# Altium PCB PS3604LF.PcbDoc (part 2 of 2)
Units mm, origin at the board's own origin, x right, y up, seen from the top; angles counter-clockwise.
Board outline 115 x 36 mm, 2 copper layers (Top Layer, Bottom Layer), stack 1.571 mm thick; 93 components, 88 nets, 378 pads, 83 vias.
Unrouted connection lines stored in the file: 6.
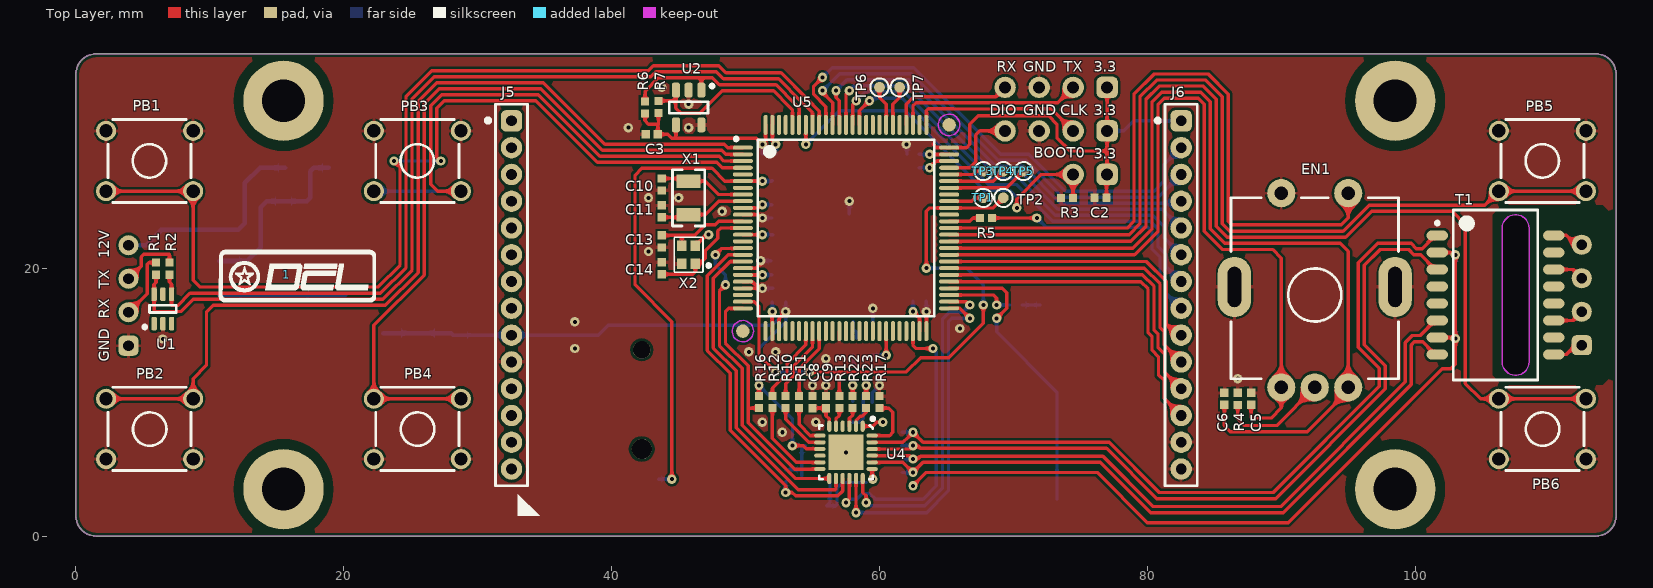
[diagram p0: Top Layer view]

## Via types
v1: diameter 0.7, hole 0.3, Top Layer to Bottom Layer, tented both sides, 83 vias

## Nets (pads, with @x,y where several pads share a name; then routed paths per layer and width w, separated by ;. In a path a pad name is that pad's centre, name@x,y a point inside that pad or via, vN(x,y) a via of type N, cw(c..) or ccw(c..) an arc to the next point about the centre after c; other vN are vias at no path point) (continued)
NetEN1_C: (continued)
  Top Layer w0.25: R4.2 86.75,8.75 87.25,8.25 89.65,8.25 EN1.C
NetLD1_1: LD1.1 R9.1 | length 1.4
  Bottom Layer w0.25: LD1.1 58.05,15.45 58.3,15.2 R9.1
NetLD2_1: LD2.1 R14.1 | length 1.4
  Bottom Layer w0.25: LD2.1 58.05,12.95 58.3,12.7 R14.1
NetLD3_1: LD3.1 R23.2 | length 4.3
  Top Layer w0.25: R23.2 v1(59,11.25)
  Bottom Layer w0.25: LD3.1@57.95,8.5 LD3.1 58.5,8.5 58.775,8.775 58.775,10.61 59,10.835 v1(59,11.25)
NetLD4_2: LD4.2 R22.2 | length 2
  Top Layer w0.25: R22.2 v1(58,11.25)
  Bottom Layer w0.25: LD4.2@58,10.05 v1(58,11.25)
NetLS1_2: LS1.2 R8.1 | length 1.4
  Bottom Layer w0.25: R8.1 LS1.2@72,17.25
NetR10_2: R10.2 U4.8 | length 4.1
  Top Layer w0.25: R10.2 53,8.705 54.705,7 U4.8
NetR11_2: R11.2 U4.7 | length 3.1
  Top Layer w0.25: R11.2 54,8.341 54.841,7.5 U4.7
NetR12_2: R12.2 U4.11 | length 6.5
  Top Layer w0.25: R12.2 52,7.295 53.795,5.5 U4.11
NetR13_2: R13.2 U4.5 | length 1.5
  Top Layer w0.25: U4.5@56.775,8.225 U4.5 56.75,8.75 57,9 R13.2
NetR17_1: R17.1 U4.24 | length 4.3
  Top Layer w0.25: U4.24 60.75,7.5 61,7.75 61,9.25 60.7,9.55 R17.1
NRST: C31.2 U5.14 | length 2.3
  Top Layer w0.25: U5.14 v1(51.25,22.5)
  Bottom Layer w0.25: v1(51.25,22.5) C31.2@52.05,22.5
OSC32_IN: C10.2 U5.8 X1.2 | length 6.3
  Top Layer w0.25: C10.2 X1.2@45.55,26.7 ; X1.2 47,26.5 48,25.5 U5.8
OSC32_OUT: C11.2 U5.9 X1.1 | length 6.3
  Top Layer w0.25: C11.2 X1.1@45.55,23.8 ; X1.1 47,24 48,25 U5.9
OSC_IN: C13.2 U5.12 X2.3 | length 7.3
  Top Layer w0.25: C13.2 45.25,22.45 ; X2.3 45.25,22.45 ; U5.12 48,23.5 47.75,23.25 47,23.25 46.2,22.45 45.25,22.45
OSC_OUT: C14.2 U5.13 X2.1 | length 8.5
  Top Layer w0.25: C14.2 46.05,19.55 46.25,19.75 X2.1 46.575,20.325 47,20.75 47,21.295 47.925,22.22 47.925,22.78 48.145,23 U5.13
RCC_MCO1: TP1.1 U5.67 | length 2.7
  Top Layer w0.25: U5.67 66.895,25 67.145,25.25 TP1.1
RD_N: R18.1 T1.3 U4.22 | length 60.9
  Top Layer w0.25: U4.22 62.25,6.5 v1(62.5,6.75)
  Top Layer w0.254: v1(62.5,6.75) 62.679,6.929 63.062,6.546 76.954,6.546 80.704,2.796 89.583,2.796 97.774,10.988 97.774,12.702 96.2,14.276 96.2,20.218 97.378,21.396 99.508,21.396 99.904,21 100.407,21 101.502,19.905 T1.3
  Bottom Layer w0.25: R18.1 v1(62.5,6.75)
RD_P: R19.1 T1.1 U4.23 | length 61.1
  Top Layer w0.25: U4.23 61.75,7 62.133,7.383
  Top Layer w0.254: 62.133,7.383 v1(62.5,7.75) 62.679,7.571 63.25,7 77.142,7 80.892,3.25 89.395,3.25 97.32,11.176 97.32,12.514 95.746,14.088 95.746,20.406 97.19,21.85 99.696,21.85 100.08,21.466 100.523,21.466 101.502,22.445 T1.1
  Bottom Layer w0.25: R19.1 v1(62.5,7.75)
RX_N: J7.3 T1.14 | length 2.4
  Top Layer w0.254: T1.14 111.78,19.905 J7.3
RX_P: J7.4 T1.16 | length 2.4
  Top Layer w0.254: T1.16 111.277,22.445 111.972,21.75 J7.4
SPI3_CLK: J6.4 U5.89 | length 32.2
  Top Layer w0.25: v1(56.75,33.25) 56.75,32.75 57,32.5 U5.89
  Bottom Layer w0.25: v1(56.75,33.25) 57.575,34.075 62.198,34.075 68.673,27.6 70.764,27.6 73.514,24.85 82,24.85 J6.4@82,25
SPI3_MISO: J6.3 U5.90 | length 35.9
  Top Layer w0.25: v1(55.75,33.25) 55.75,33.114 56.5,32.364 U5.90
  Bottom Layer w0.25: v1(55.75,33.25) 57.025,34.525 62.384,34.525 68.859,28.05 70.95,28.05 73.7,25.3 80.8,25.3 82.5,27 82,27.5 J6.3@82,27
SPI3_MOSI: J6.2 U5.91 | length 37.2
  Top Layer w0.25: v1(55.75,34.25) 55.075,33.575 55.075,32.97 56,32.045 U5.91
  Bottom Layer w0.25: v1(55.75,34.25) 56.475,34.975 62.571,34.975 69.046,28.5 71.137,28.5 73.887,25.75 80.5,25.75 81.203,26.453 81.203,27.678 J6.2
SWCLK: J3.2 U5.76 | length 12.8
  Top Layer w0.25: U5.76 63.5,31.75 63.648,31.898 65.567,31.898 65.578,31.887 69.04,31.887 69.051,31.898 72.812,31.898 J3.2
SWDIO: J3.4 U5.72 | length 6.5
  Top Layer w0.25: U5.72 66.75,27.5 67.2,27.95 67.2,29.95 67.5,30.25 J3.4
TD_N: R20.1 T1.8 U4.20 | length 52.6
  Top Layer w0.25: U4.20 61.75,5.5 v1(62.5,4.75)
  Top Layer w0.254: v1(62.5,4.75) 63.25,5.5 76.5,5.5 80.25,1.75 90.137,1.75 99.704,11.317 99.704,14.264 99.938,14.498 100.559,14.498 101.502,13.555 T1.8
  Bottom Layer w0.25: R20.1 v1(62.5,4.75)
TD_P: R21.1 T1.6 U4.21 | length 52.4
  Top Layer w0.25: U4.21 62.25,6 v1(62.5,5.75)
  Top Layer w0.254: v1(62.5,5.75) 62.679,5.571 63.062,5.954 76.688,5.954 80.438,2.204 89.949,2.204 99.25,11.505 99.25,14.452 99.773,14.975 100.382,14.975 101.502,16.095 T1.6
  Bottom Layer w0.25: R21.1 v1(62.5,5.75)
TIM4_CH1: C5.2 EN1.A U5.59 | length 60.5
  Top Layer w0.25: U5.59 79.046,21 80.8,22.754 80.8,32.254 81.246,32.7 83.8,32.7 84.25,32.25 84.25,22.75 85.6,21.4 89.35,21.4 90,20.75 EN1.A 90,9.564 89.25,8.814 87.75,8.814 C5.2
TIM4_CH2: C6.2 EN1.B U5.60 | length 73.3
  Top Layer w0.25: U5.60 78.909,21.5 80.35,22.941 80.35,32.441 81.059,33.15 83.986,33.15 84.7,32.436 84.7,22.936 85.786,21.85 94.4,21.85 95,21.25 95,10.864 91.936,7.8 86.2,7.8 85.75,8.25 C6.2
TIM8_CH2: R5.2 U5.64 | length 2.4
  Top Layer w0.25: U5.64 66.75,23.5 67,23.75 R5.2
TIM12_CH1: R8.2 U5.53 | length 5.1
  Top Layer w0.25: U5.53 68.5,18 68.75,17.75 v1(68.75,17.25)
  Bottom Layer w0.25: v1(68.75,17.25) R8.2
TIM12_CH2: LS1.1 U5.54 | length 22
  Top Layer w0.25: U5.54 69.173,18.5 69.5,18.173 69.5,17 v1(68.75,16.25)
  Bottom Layer w0.25: v1(68.75,16.25) 68.75,15.25 73.25,10.75 LS1.1
TX_N: J7.1 T1.9 | length 2.4
  Top Layer w0.254: T1.9 111.277,13.555 111.972,14.25 J7.1
TX_P: J7.2 T1.11 | length 2.4
  Top Layer w0.254: T1.11 111.78,16.095 J7.2
UART1_RX: R1.2 U1.6 U5.93 | length 69
  Top Layer w0.25: R1.2 5.991,18.961 5.841,18.811 U1.6 5.841,16.861 5.941,16.761 7.84,16.761 8.752,17.673 22.91,17.673 25.1,19.864 25.1,32.646 26.754,34.3 42.937,34.3 43.312,34.675 47.825,34.675 48.35,34.15 52.464,34.15 54.175,32.439 54.175,32.416 55,31.591 U5.93
UART1_TX: R2.2 U1.4 U5.92 | length 67.8
  Top Layer w0.25: R2.2 6.991,18.961 7.141,18.811 U1.4 ; U1.4@7.141,17.811 7.141,17.211 7.605,17.211 8.517,18.123 22.723,18.123 24.65,20.05 24.65,32.832 26.568,34.75 42.75,34.75 43.125,35.125 48.011,35.125 48.536,34.6 52.65,34.6 54.625,32.625 54.625,32.602 55.5,31.727 U5.92
UART3_RX: J6.11 U5.56 | length 24.1
  Top Layer w0.25: U5.56 79.636,19.5 80.5,18.636 80.5,15.361 80.8,15.061 80.8,14.064 81.283,13.581 81.283,12.242 J6.11
UART3_TX: J6.12 U5.55 | length 25.6
  Top Layer w0.25: U5.55 79.5,19 80.05,18.45 80.05,15.175 80.35,14.875 80.35,13.878 80.833,13.395 80.833,12.033 81.25,11.616 81.25,10.275 J6.12
UART4_RX: J2.4 U5.79 | length 9.4
  Top Layer w0.25: U5.79 62,32.25 62.548,32.798 68.678,32.798 J2.4
UART4_TX: J2.2 U5.78 | length 13.9
  Top Layer w0.25: U5.78 62.5,32.114 62.734,32.348 73.308,32.348 J2.2
USB_OTG_FS_DM: TP4.1 U5.70 | length 4.4
  Top Layer w0.25: U5.70 68.5,26.5 TP4.1
USB_OTG_FS_DP: TP3.1 U5.71 | length 2.7
  Top Layer w0.25: U5.71 67,27 67.25,27.25 TP3.1
USB_OTG_FS_ID: TP5.1 U5.69 | length 6.1
  Top Layer w0.25: U5.69 69.5,26 TP5.1
USB_OTG_FS_VBUS: U5.68
VBAT: C1.2 SK1.1 U5.6 | length 35.7
  Top Layer w0.25: v1(44.5,4.25) 44.5,16 41.75,18.75 41.75,26.95 42.25,27.45 47.5,27.45 48.45,26.5 U5.6 v1(51.25,26.5)
  Bottom Layer w0.25: SK1.1@43.5,4.25 v1(44.5,4.25) ; v1(51.25,26.5) 51.95,26.5 C1.2
VCAP1: C29.2 U5.49 | length 2.5
  Top Layer w0.25: v1(62.5,16.75) 63,16.25 U5.49
  Bottom Layer w0.25: v1(62.5,16.75) C29.2
VCAP2: C30.2 U5.73 | length 2.5
  Top Layer w0.25: v1(63.75,27.5) 64.25,28 U5.73
  Bottom Layer w0.25: C30.2 v1(63.75,27.5)
VDD_LAN: C12.1 C15.2 C16.2 C17.2 C18.1 C19.1 L1.1 LD3.2 R18.2 R19.2 R20.2 R21.2 T1.2 T1.7 U4.1 U4.19 | length 69
  Top Layer w0.25: U4.1 59.5,8.2 59.8,8.5 v1(60.25,8.5) ; U4.19 59.45,4.3 v1(59.5,4.25) ; v1(62.5,3.75) 63.5,4.75 76.25,4.75 80,1 90.51,1 102.002,12.492 102.659,12.492 103,12.833 v1(103,14.75) v1@103,14.825 ; T1.7 v1@103,14.825 ; T1.2 102.655,21.175 103,20.83 v1@103,14.825
  Bottom Layer w0.25: L1.1 56.3,2.5 C17.2 56.75,2.25 56.825,2.325 56.825,3.575 57.25,4 59,4 ; v1(103,14.75) C18.1 ; C19.1 v1(103,21)
pads on no net: J5.1 J5.2 J5.3 J5.4 J5.5 J5.6 J5.7 J5.8 J5.11 J5.12 J5.13 J5.14 SK1.MH1 SK1.MH2 T1.4 T1.5 T1.10 T1.12 T1.13 T1.15 U1.1 U1.3 U1.5 U4.4 U4.10 U5.5 U5.7 U5.15 U5.23 U5.26 U5.29 U5.30 U5.31 U5.35 U5.36 U5.38 U5.39 U5.40 U5.41 U5.42 U5.43 U5.45 U5.46 U5.47 U5.65 U5.77 U5.80 U5.83 U5.84 U5.85 U5.97 U5.98 U5.FTG1 U5.FTG2

## Polygon pours and split planes (outlines as drawn)
0V on Top Layer "0V_L01_P003" (solid, pour order 3): 0,1.5 0,34.5 cw(c1.5,34.5) 1.5,36 113.5,36 cw(c113.5,34.5) 115,34.5 115,1.5 cw(c113.5,1.5) 113.5,0 1.5,0 cw(c1.5,1.5)
+3.3V on Top Layer "+3.3V_L01_P002" (solid, pour order 2): 51,29.5 51,16.5 64,16.5 64,29.5
no net on Top Overlay "NONET_L01_P-001" (solid, pour order 12): 33,1.5 33,3.123 34.623,1.5
0V on Bottom Layer "0V_L02_P011" (solid, pour order 11): 0,1.5 0,34.5 cw(c1.5,34.5) 1.5,36 113.5,36 cw(c113.5,34.5) 115,34.5 115,1.5 cw(c113.5,1.5) 113.5,0 1.5,0 cw(c1.5,1.5)
VDD_LAN on Bottom Layer "VDD_LAN_L02_P010" (solid, pour order 10): 59,10.75 59,8 59,4.75 59,3 62.5,3 63,3.5 63,8.25 60.5,10.75

## Keep-outs
Keep-Out Layer:
  lines w0.1: 0,1.5 ccw(c1.5,1.5) 1.5,0 113.5,0 ccw(c113.5,1.5) 115,1.5 115,34.5 ccw(c113.5,34.5) 113.5,36 1.5,36 ccw(c1.5,34.5) 0,34.5 0,1.5 ; 106.5,13 ccw(c107.5,13) 108.5,13 108.5,23 ccw(c107.5,23) 106.5,23 106.5,13

## Other copper
Top Layer:
  pour cut-out: 114,24.75 106.5,24.75 105.75,24 105.75,12 106.5,11.25 114,11.25 114.75,12 114.75,24
Bottom Layer:
  pour cut-out: 114,24.75 106.5,24.75 105.75,24 105.75,12 106.5,11.25 114,11.25 114.75,12 114.75,24

## Silkscreen, mask and mechanical layers (free items; w line width, h text height)
Top Overlay:
  text "RX" at 68.75,34.675 h0.8
  text "GND" at 70.75,34.675 h0.8
  text "TX" at 73.75,34.675 h0.8
  text "3.3" at 76,34.675 h0.8
  text "DIO" at 68.25,31.425 h0.8
  text "GND" at 70.75,31.425 h0.8
  text "CLK" at 73.5,31.425 h0.8
  text "3.3" at 76,31.425 h0.8
  text "BOOT0" at 71.5,28.25 h0.8
  text "3.3" at 76,28.175 h0.8
  text "12V" at 2.5,20.75 h0.8 r90
  text "TX" at 2.491,18.461 h0.8 r90
  text "RX" at 2.491,16.211 h0.8 r90
  text "GND" at 2.5,13 h0.8 r90
Bottom Overlay:
  lines w0.15: 60,1.25 60.25,1.25 60.25,6.75 60,6.75 ; 60,2.5 60.25,2.5 ; 60,3.75 60.25,3.75 ; 60,4.75 60.25,4.75 ; 60,5.75 60.25,5.75
  text "PS3604LF V2.1" at 65.5,32.25 h1.2
  text "POWER" at 57,15.5 h1
  text "Ethernet" at 104.5,14.25 h1 r270
  text "CONNECT" at 57,13 h1
  text "LINK" at 57,9.5 h1
  text "SPEED" at 57,8 h1
Top Solder:
  region: 114,24.75 106.5,24.75 105.75,24 105.75,12 106.5,11.25 114,11.25 114.75,12 114.75,24
Bottom Solder:
  region: 114,24.75 106.5,24.75 105.75,24 105.75,12 106.5,11.25 114,11.25 114.75,12 114.75,24

## Dimensions
1.5,0 to 1.5,36 on Mechanical 14
115,34.5 to 0,34.5 on Mechanical 14
98.5,3.5 to 98.5,32.5 on Mechanical 14
15.5,3.5 to 98.5,3.5 on Mechanical 14